# Altium PCB INS_Visualizer.PcbDoc
Units mm, origin at the board's own origin, x right, y up, seen from the top; angles counter-clockwise.
Board outline 100 x 70 mm, 2 copper layers (Top Layer, Bottom Layer), stack 1.671 mm thick; 23 components, 18 nets, 122 pads, 332 vias.
Unrouted connection lines stored in the file: 3.
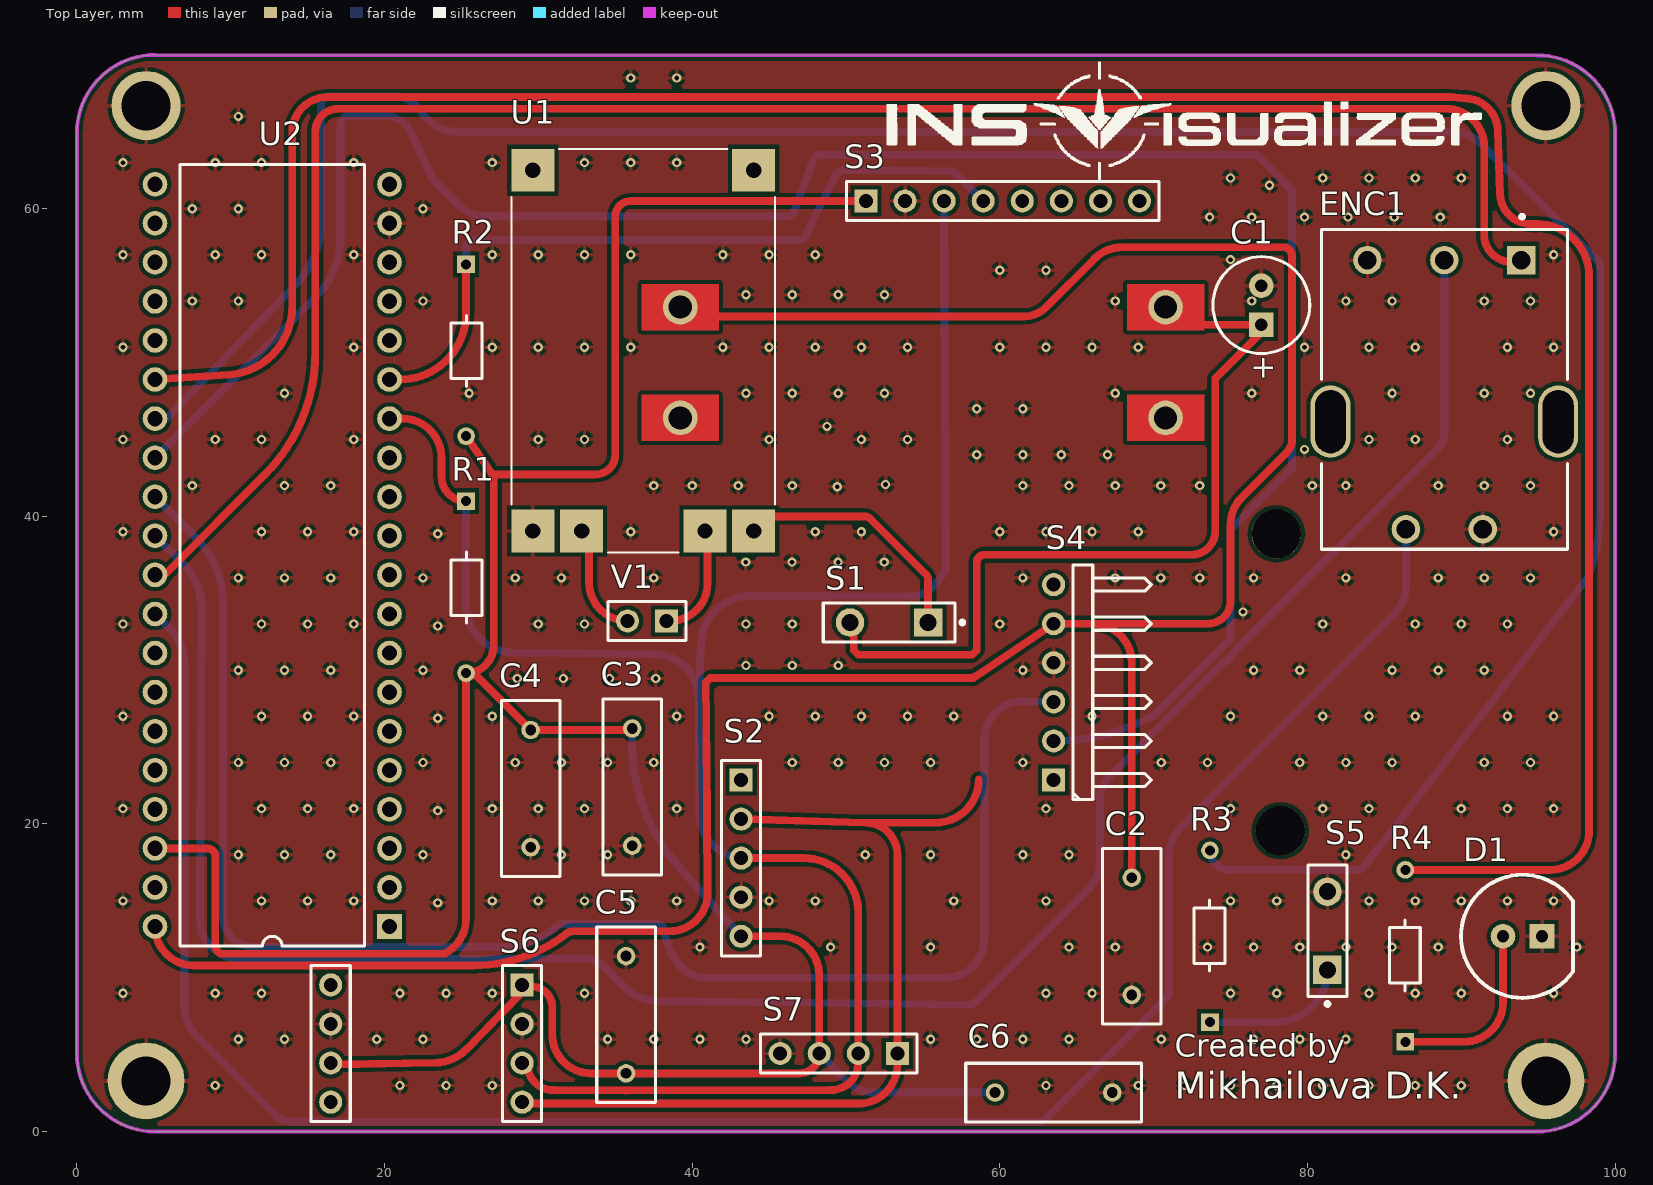
[diagram p0: Top Layer view]
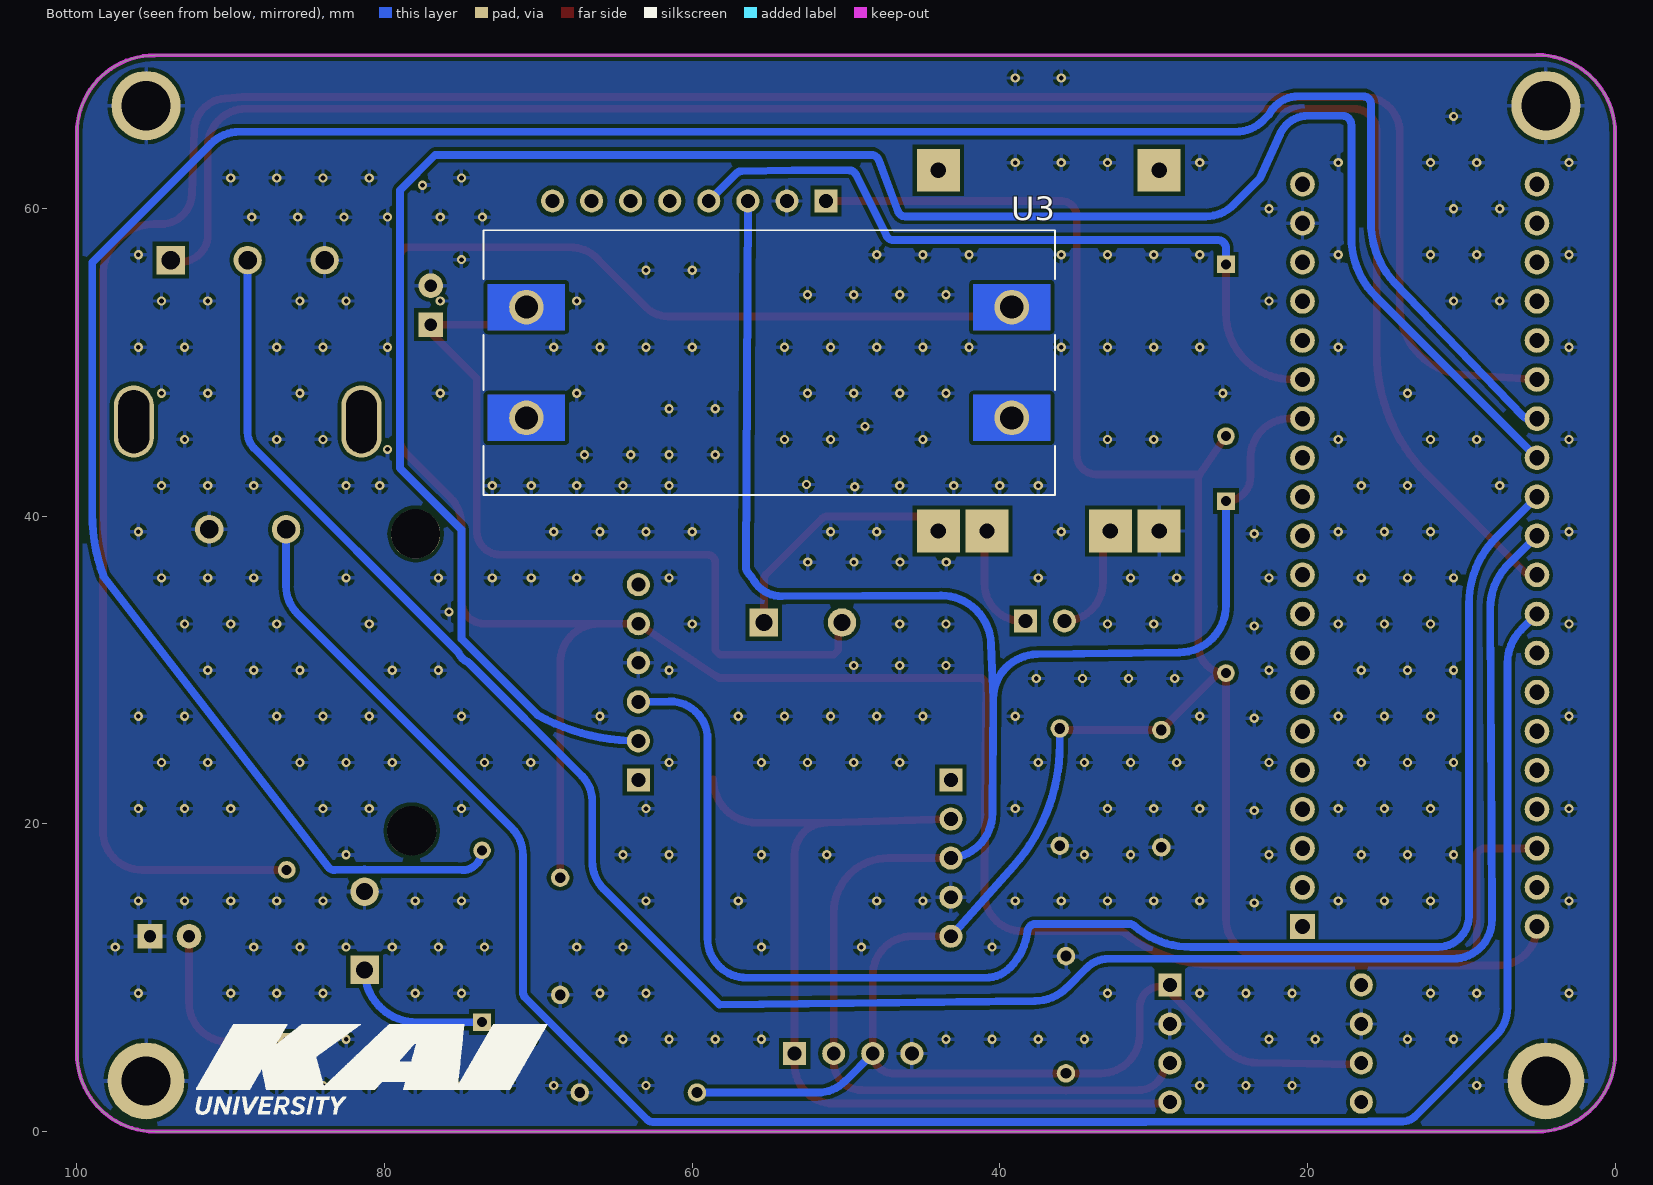
[diagram p1: Bottom Layer view, seen from below]

## Layer stack, top to bottom
Top Solder: solder mask 0.0102, Solder Resist, Dk 3.5
Top Layer: signal copper 0.0356
Dielectric 1: dielectric 1.6, FR-4, Dk 4.8
Bottom Layer: signal copper 0.0356
Bottom Solder: solder mask 0.0102, Solder Resist, Dk 3.5

## Board outline
0,5.08 0,64.92 cw(c5.08,64.92) 5.08,70 94.952,69.973 cw(c94.952,64.924) 100,64.924 100,5.08 cw(c94.92,5.08) 94.92,0 5.08,0 cw(c5.08,5.08)

## Design rules (kind name [scope] priority, off if disabled: settings)
Clearance [All] p1: gap=0.254 ignorepadtopadclearanceinfootprint=FALSE
ComponentClearance [All] p1: gap=0.254 collisioncheckmode=3 verticalgap=0 showdistances=FALSE
PolygonConnect [All] p1: connectstyle=Relief reliefconductorwidth=0.254 reliefentries=4 polygonreliefangle="90 Angle" airgapwidth=0.254
RoutingVias [All] p1: holewidth=0.3 width=0.6 viastyle="Through Hole" minholewidth=0.3 minwidth=0.6 maxholewidth=0.5 maxwidth=1
SolderMaskExpansion [All] p1: expansion=0 istentingtop=FALSE
SupplyNets "Schematic Supply Nets_3" [InNet('+3V3')] p1: voltage=0.000
SupplyNets "Schematic Supply Nets_1" [InNet('GND')] p2: voltage=0.000
SupplyNets "Schematic Supply Nets" [InNet('VCC')] p3: voltage=0.000
Width [All] p1: maxlimit=1.27 minlimit=0.254 preferedwidth=0.508
29 further rules are at their usual default settings.

## Components (designator, comment, footprint, x,y, rotation, side; value= is the part's Value field where it differs from the comment)
C1 "Capacitor Pol" "Capacitor Pol" 77,53.73 r90 top value=47uF
C2 "Capacitor Cer" "CAPACITOR CER" 68.58,12.7 r90 top value=100nF
C3 "Capacitor Cer" "CAPACITOR CER" 36.1,22.4 r90 top value=100nF
C4 "Capacitor Cer" "CAPACITOR CER" 29.5,22.3 r90 top value=100nF
C5 "Capacitor Cer" "CAPACITOR CER" 35.7,7.6 r270 top value=100nF
C6 "Capacitor Cer" "CAPACITOR CER" 63.5,2.54 r180 top value=100nF
D1 "LED 8mm" LED 93.98,12.7 r0 top
ENC1 "PEC16-4115F-S0012" FP-PEC16-4115F-S0012-MFG 88.9,48.26 r180 top
R1 "Resistor" Resistor 25.3,35.4 r270 top value=2K2
R2 "Resistor" Resistor 25.3,50.8 r270 top value=2K2
R3 "Resistor" Resistor 73.66,12.7 r90 top value=330
R4 "Resistor" Resistor 86.36,11.43 r90 top value=330
S1 "SW-SPST" SPST-2 52.8,33.1 r180 top
S2 "QMC5883L" QMC5883L 43.18,22.86 r270 top
S3 "MPU_6050" MPU6050_HDR1X8 51.3,60.5 r0 top
S4 "HC-05" HC-05_HDR1x6H 63.5,22.86 r90 top
S5 "SW-PB" SPST-2 81.3,13.06 r90 top
S6 "BMP580" BMP580_HDR1x4 28.946,9.54 r270 top
S7 "OLED_I2C_128*64" OLED_HDR1x4 53.34,5.08 r180 top
U1 "TP4056_Type_c" TP4056_TYPE_C 36.82,50.775 r270 top
U2 "STM32_BlackPillf411" STM32_HDR2x20 20.32,13.335 r180 top
U3 "MT3608" MT3608 55,50 r180 bottom
V1 "Constant Voltage Source" BATTERY 38.34,33.2 r180 top

## Footprints (in the part's own frame and the unit in brackets; to place one, negate y for a bottom-side part, rotate by r counter-clockwise, add the part's x,y. Pads: shape width x height; smd on the part's side, far side on the other; paste and mask are expansions set on the pad)
BATTERY [mm] "Connector; Header; 2 Position"
  rect 1.5x1.5 hole 0.9: 1(0,0)
  round 1.5 hole 0.9: 2(2.54,0)
  silkscreen extent -1.27,-1.27 3.81,1.27
BMP580_HDR1x4 [mm]
  rect 1.5x1.5 hole 0.9: 1(0,0)
  round 1.5 hole 0.9: 2(2.54,0) 3(5.08,0) 4(7.62,0) 5(7.62,-12.446) 6(5.08,-12.446) 7(2.54,-12.446) 8(0,-12.446)
  silkscreen extent -1.27,-13.72 8.89,1.27, body extent -1.27,-13.72 8.89,1.27, height 8.89
"CAPACITOR CER" [mm]
  round 1.2 hole 0.7: 1(-3.81,0) 2(3.81,0)
  silkscreen extent -5.71,-1.91 5.71,1.91, body extent -4.43,-2.28 4.43,2.29, height 3.2
"Capacitor Pol" [mm]
  rect 1.6x1.6 hole 0.8: 1(-1.27,0)
  round 1.6 hole 0.8: 2(1.27,0)
  silkscreen extent -3.15,-3.15 3.15,3.15, body extent -2.5,-2.49 2.5,2.49, height 11.5
FP-PEC16-4115F-S0012-MFG [mm]
  rrect100% 2.6x4.7 hole 4.1 slot 2 at 0 deg paste-2539.97 mask+0: 1(-7.4,2.1) 2(7.4,2.1)
  rect 1.85x1.85 hole 1.2 paste-2539.97 mask+0: A(-5,-8.4)
  round 1.85 hole 1.2 paste-2539.97 mask+0: B(0,-8.4) C(5,-8.4) D(-2.5,9.1) E(2.5,9.1)
  silkscreen extent -8,-11.35 8,10.4, body extent -8.8,-10.5 8.8,10.5, height 0.25
HC-05_HDR1x6H [mm]
  rect 1.5x1.5 hole 0.9: 1(0,0)
  round 1.5 hole 0.9: 2(2.54,0) 3(5.08,0) 4(7.62,0) 5(10.16,0) 6(12.7,0)
  silkscreen extent -1.27,-6.35 13.97,-1.27, body extent -1.53,-40.58 14.23,0.38, height 4.47
LED [mm] "8mm"
  round 1.6 hole 0.8: 1(-1.27,0)
  rect 1.6x1.6 hole 0.8: 2(1.27,0)
  silkscreen extent -4,-4 3.28,4, body extent -4.5,-4.5 3.9,4.5, height 12
MPU6050_HDR1X8 [mm] "Connector; Header; 8 Position"
  rect 1.5x1.5 hole 0.9: 1(0,0)
  round 1.5 hole 0.9: 2(2.54,0) 3(5.08,0) 4(7.62,0) 5(10.16,0) 6(12.7,0) 7(15.24,0) 8(17.78,0)
  silkscreen extent -1.27,-1.27 19.05,1.27, body extent -1.66,-14.6 19.44,1.27, height 6.07
MT3608 [mm] "DC-DC"
  round 2.25 hole 1.5 mask+0: 1(-15.775,3.6) 2(-15.775,-3.6) 3(15.775,3.6) 4(15.775,-3.6)
  Top Layer region: 18.275,-5.1 13.275,-5.1 13.275,-2.1 18.275,-2.1
  Top Layer region: -13.275,-5.1 -18.275,-5.1 -18.275,-2.1 -13.275,-2.1
  Top Layer region: 18.275,2.1 13.275,2.1 13.275,5.1 18.275,5.1
  Top Layer region: -13.275,2.1 -18.275,2.1 -18.275,5.1 -13.275,5.1
  Bottom Layer region: 18.275,-5.1 13.275,-5.1 13.275,-2.1 18.275,-2.1
  Bottom Layer region: -13.275,-5.1 -18.275,-5.1 -18.275,-2.1 -13.275,-2.1
  Bottom Layer region: 18.275,2.1 13.275,2.1 13.275,5.1 18.275,5.1
  Bottom Layer region: -13.275,2.1 -18.275,2.1 -18.275,5.1 -13.275,5.1
  silkscreen extent -18.57,-8.6 18.57,8.6, body extent -18.57,-8.83 18.58,8.6, height 6.45
OLED_HDR1x4 [mm]
  rect 1.5x1.5 hole 0.9: 1(0,0)
  round 1.5 hole 0.9: 2(2.54,0) 3(5.08,0) 4(7.62,0)
  silkscreen extent -1.27,-1.27 8.89,1.27, body extent -1.27,-1.27 8.89,1.27, height 8.89
QMC5883L [mm]
  rect 1.5x1.5 hole 0.9: 1(0,0)
  round 1.5 hole 0.9: 2(2.54,0) 3(5.08,0) 4(7.62,0) 5(10.16,0)
  silkscreen extent -1.27,-1.27 11.43,1.27, body extent -1.65,-1.38 11.85,17.12, height 8.89
Resistor [mm] "2.2kOhm"
  rect 1.15x1.15 hole 0.65 paste-2539.97 mask+0: 1(-5.588,0)
  round 1.15 hole 0.65 paste-2539.97 mask+0: 2(5.588,0)
  silkscreen extent -2.27,-0.97 2.34,1.03, body extent -5.77,-1.2 5.77,1.2, height 2.39
SPST-2 [mm] "Switch; 2 Leads"
  rect 1.85x1.85 hole 1.1: 1(-2.54,0)
  round 1.85 hole 1.1: 2(2.54,0)
  silkscreen extent -4.89,-1.27 4.28,1.27
STM32_HDR2x20 [mm]
  rect 1.6x1.6 hole 1: 1(0,0)
  round 1.6 hole 1: 2(0,-2.54) 3(0,-5.08) 4(0,-7.62) 5(0,-10.16) 6(0,-12.7) 7(0,-15.24) 8(0,-17.78) 9(0,-20.32) 10(0,-22.86) 11(0,-25.4) 12(0,-27.94) 13(0,-30.48) 14(0,-33.02) 15(0,-35.56) 16(0,-38.1) 17(0,-40.64) 18(0,-43.18) 19(0,-45.72) 20(0,-48.26) 21(15.24,-48.26) 22(15.24,-45.72) 23(15.24,-43.18) 24(15.24,-40.64) 25(15.24,-38.1) 26(15.24,-35.56) 27(15.24,-33.02) 28(15.24,-30.48) 29(15.24,-27.94) 30(15.24,-25.4) 31(15.24,-22.86) 32(15.24,-20.32) 33(15.24,-17.78) 34(15.24,-15.24) 35(15.24,-12.7) 36(15.24,-10.16) 37(15.24,-7.62) 38(15.24,-5.08) 39(15.24,-2.54) 40(15.24,0)
  silkscreen extent 1.63,-49.53 13.61,1.27, body extent -2.54,-54.1 17.78,2.54, height 12.86
TP4056_TYPE_C [mm]
  rect 2.79x2.79 / inner round 2.79 / far side rect 2.79x2.79 hole 1 mask+0.102: BAT_N(11.725,-4.01) BAT_P(11.725,4.01) IN_N(-11.725,-7.18) IN_P(-11.725,7.18) OUT_N(11.725,-7.18) OUT_P(11.725,7.18)
  silkscreen extent -13.12,-8.57 13.12,8.57, body extent -14.39,-8.7 14.91,8.7, height 4.14

## Part data
C1: "Polarized Capacitor (Radial)", LatestRevisionDate=17-Jul-2002, LatestRevisionNote="Re-released for DXP Platform.", PackageDescription="Polarized Capacitor (Radial); 2 Leads", PackageReference=RB7.6-15, Published=8-Jun-2000, Publisher="Altium Limited"
ENC1: library part CMP-07421-000056-1, "ROTARY ENCODER MECHANICAL 12PPR", Max Operating Temperature=70°C, Min Operating Temperature=-30°C, Operating Supply Voltage=5V, Package Quantity=50, Built in Switch=Yes, Detent=Yes, Encoder Type=Mechanical, Height=17.3mm, Length=23mm, Mount="Through Hole", Number of Channels=2, Orientation=Vertical, Output Type=Quadrature, Pulses per Revolution=12, RoHS Compliant=Yes, Series=PEC16, Termination="PC Pin", Width=16mm
S1: "Single-Pole, Single-Throw Switch", LatestRevisionDate=17-Jul-2002, LatestRevisionNote="Re-released for DXP Platform.", PackageDescription="Switch; 2 Leads", PackageReference=SPST-2, Published=24-Mar-1999, Publisher="Altium Limited"
S5: "Switch", LatestRevisionDate=17-Jul-2002, LatestRevisionNote="Re-released for DXP Platform.", PackageDescription="Switch; 2 Leads", PackageReference=SPST-2, Published=24-Mar-1999, Publisher="Altium Limited"
U1: "The TP4056ES Li-Ion charger is an improved version of the TP4056, ideal for 18650 batteries, with a micro USB connection for direct PC charging.", Package=Package, Check_prices=https://www.snapeda.com/parts/TP4056%20Micro-USB%20Charger%20-%201A/Generic/view-part/?ref=eda, MF=Generic, MP="TP4056 Micro-USB Charger - 1A", SnapEDA_Link=https://www.snapeda.com/parts/TP4056%20Micro-USB%20Charger%20-%201A/Generic/view-part/?ref=snap
V1: library part Battery, DC Magnitude="3.0 - 4.0V", SimulationGenericComponent=True
C2 C3 C4 C5 C6: LatestRevisionDate=17-Jul-2002, LatestRevisionNote="Re-released for DXP Platform.", PackageDescription="Radial Cap, Thru-Hole; 2 Leads; 0.3 in Pin Spacing", PackageReference=RAD-0.3, Published=8-Jun-2000, Publisher="Altium Limited"
R1 R2 R3 R4: LatestRevisionDate=17-Jul-2002, LatestRevisionNote="Re-released for DXP Platform.", PackageDescription="Axial Device, Thru-Hole; 2 Leads; 0.3 in Pin Spacing", PackageReference=AXIAL-0.3, Published=8-Jun-2000, Publisher="Altium Limited"

## Free pads (board coordinates)
  round 5 hole 3.2 paste-2539.97 mask-2539.97: 1(4.5,3.3) 1(95.5,3.3)
  round 4.5 hole 3.2 paste-2539.97 mask-2539.97: 1(4.5,66.7) 1(95.5,66.7)
  round 3.2 hole 3.2 unplated: 2(77.978,38.862) 2(78.232,19.558)

## Via types
v1: diameter 0.6, hole 0.3, Top Layer to Bottom Layer, 332 vias

## Nets (pads, with @x,y where several pads share a name; then routed paths per layer and width w, separated by ;. In a path a pad name is that pad's centre, name@x,y a point inside that pad or via, vN(x,y) a via of type N, cw(c..) or ccw(c..) an arc to the next point about the centre after c; other vN are vias at no path point)
+3V3: C3.2 C4.2 C5.2 C6.2 R1.2 R2.2 S2.5 S3.1 S6.1 S6.6 S7.3 U2.38 | length 192.7
  Top Layer w0.508: U2.38 8.492,18.415 cw(c8.492,17.907) 9,17.907 9,12.07 ccw(c9.508,12.07) 9.508,11.562 23.76,11.562 ccw(c23.758,12.07) 24.006,11.627 ccw(c22.76,13.84) 25.3,13.84 R1.2 ; S6.6@16.854,4.36 23.299,4.478 ccw(c23.245,7.389) 25.337,5.364 28.804,8.944 29.3,9.44 29.796,9.419 cw(c29.56,8.1) 30.9,8.1 30.9,6.33 ccw(c33.44,6.33) 33.44,3.79 C5.2 46.97,3.79 ccw(c46.97,5.08) S7.3 48.26,10.16 ccw(c45.72,10.16) 45.72,12.7 S2.5 ; R2.2 27.01,42.73 ; C3.2 cw(c35.859,26.451) 35.859,26.11 C4.2 26.15,29.46 ccw(c25.3,28.61) R1.2 ; S3.1@51.697,60.5 36,60.5 ccw(c36,59.5) 35,59.5 35,44.003 cw(c33.727,44.003) 33.727,42.73 27.01,42.73 ; R1.2 ccw(c25.3,31.612) 27.1,31.612 27.1,42.442 ccw(c26.592,42.442) 27.01,42.73
  Bottom Layer w0.508: C3.2 36.1,25.173 ccw(c47.997,25.173) 39.118,17.254 S2.5 ; S7.3 50.056,3.284 ccw(c51.852,5.08) 51.852,2.54 C6.2
GND: C1.2 C2.1 C3.1 C4.1 C5.1 C6.1 D1.2 ENC1.C ENC1.D pad.1 S2.4 S3.2 S4.4 S5.2 S6.2 S6.7 S7.4 U1.OUT_N U2.19 U3.2 U3.4
  other v1: 9,3 21,3 24,3 27,3 63,3 69,3 72,3 75,3 78,3 81,3 84,3 87,3 90,3 10.5,6 13.5,6 19.5,6 22.5,6 34.5,6 37.5,6 40.5,6 43.5,6 55.5,6 58.5,6 61.5,6 64.5,6 70.5,6 76.5,6 79.5,6 82.5,6 3,9 9,9 12,9 21,9 24,9 27,9 33,9 63,9 66,9 75,9 78,9 84,9 87,9 90,9 96,9 40.5,12 49,12 55.5,12 64.5,12 67.5,12 73.5,12 76.5,12 79.5,12 82.5,12 85.5,12 88.5,12 97.5,12 23.46,14.873 3,15 12,15 15,15 18,15 27,15 30,15 33,15 36,15 39,15 45,15 48,15 57,15 63,15 75,15 78,15 84,15 87,15 90,15 93,15 96,15 10.5,18 13.5,18 16.5,18 22.5,18 31.5,18 34.5,18 51.252,17.999 55.5,18 61.5,18 64.5,18 82.5,18 23.46,20.873 3,21 12,21 15,21 18,21 27,21 30,21 33,21 39,21 63,21 75,21 81,21 84,21 90,21 93,21 96,21 10.5,24 13.5,24 16.5,24 22.5,24 28.5,24 31.5,24 34.5,24 37.5,24 46.5,24 49.5,24 52.5,24 55.5,24 61.5,24 70.5,24 73.5,24 79.5,24 82.5,24 85.5,24 91.5,24 94.5,24 23.46,26.873 3,27 12,27 15,27 18,27 27,27 39,27 45,27 48,27 51,27 54,27 57,27 66,27 75,27 81,27 84,27 87,27 93,27 96,27 28.627,29.46 31.627,29.46 34.627,29.46 37.627,29.46 10.5,30 13.5,30 16.5,30 22.5,30 61.5,30 76.5,30 79.5,30 85.5,30 88.5,30 91.5,30 43.5,30.304 46.5,30.304 49.5,30.305 23.46,32.873 3,33 12,33 15,33 18,33 30,33 33,33 43.5,33 46.5,33 60,33 81,33 87,33 90,33 93,33 75.808,33.787 10.5,36 13.5,36 16.5,36 22.5,36 28.5,36 31.5,36 37.5,36 61.5,36 67.5,36 70.467,36 73,36 76.5,36 82.5,36 88.5,36 91.5,36 94.5,36 43.488,37.027 46.488,37.027 49.488,37.027 52.488,37.027 23.46,38.873 3,39 12,39 15,39 18,39 36,39 48,39 51,39 60,39 63,39 66,39 69,39 96,39 49.429,41.929 7.5,42 13.5,42 16.5,42 37.5,42 40,42 43,42 46.5,42 61.5,42 64.5,42 67.5,42 70.467,42 73,42 80.308,42 82.5,42 88.5,42 91.5,42 94.5,42 52.571,42.071 58.5,44 61.5,44 64,44 67,44 79.808,44.352 3,45 9,45 12,45 18,45 30,45 33,45 45,45 51,45 54,45 84,45 87,45 93,45 48.766,45.848 58.5,47 61.5,47 13.5,48 25.5,48 43.5,48 46.5,48 49.5,48 52.5,48 67.5,48 76.384,48 85.5,48 91.5,48 94.5,48 3,51 18,51 27,51 30,51 33,51 36,51 42,51 45,51 48,51 51,51 54,51 60,51 63,51 66,51 69,51 79.808,51 84,51 87,51 93,51 96,51 7.5,54 10.5,54 22.5,54 67.5,54 76.384,54 82.5,54 85.5,54 91.5,54 94.5,54 43.5,54.408 46.5,54.408 49.5,54.408 52.5,54.408 60,56 63,56 75,56.692 3,57 9,57 12,57 18,57 27,57 30,57 33,57 36,57 42,57 45,57 48,57 96,57 73.639,59.455 76.384,59.455 79.808,59.455 82.639,59.455 85.639,59.455 88.639,59.455 7.5,60 10.5,60 22.5,60 77.529,61.529 75,62 81,62 84,62 87,62 90,62 3,63 9,63 12,63 18,63 27,63 33,63 36,63 39,63 10.5,66 36,68.5 39,68.5
NetC1_1: C1.1 S1.2 U3.1 | length 54.6
  Top Layer w0.508: S1.2 50.5,32.86 50.5,31.298 50.798,31 58.202,31 58.5,31.298 58.5,37 cw(c59,37) 59,37.5 72.46,37.5 ccw(c72.46,39.04) 74,39.04 74,48.96 77.5,52.46 73.289,52.46 71.912,52.46 70.939,53.434 70.78,53.593 U3.1@70.78,53.604
NetD1_1: D1.1 R4.1 | length 12.1
  Top Layer w0.508: R4.1 90.17,5.842 ccw(c90.17,8.382) 92.71,8.382 D1.1
NetENC1_A: ENC1.A U2.31 | length 120.4
  Top Layer w0.508: U2.31 5.485,36.195 ccw(c5.485,36.703) 5.843,36.343 12.23,42.73 ccw(c4.339,50.623) 15.5,50.621 15.5,64.998 cw(c17.001,64.999) 17.002,66.5 89,66.5 cw(c89,64.002) 91.498,64.002 91.498,58.043 ccw(c93.263,58.332) 93.229,56.543 ENC1.A
NetENC1_B: ENC1.B U2.30 | length 139.5
  Bottom Layer w0.508: U2.30 6.93,36.885 cw(c4.071,34.022) 8.117,33.998 8.006,14 8.006,13.778 ccw(c10.546,13.778) 10.546,11.238 32.925,11.238 cw(c32.925,9.218) 34.354,10.646 34.355,10.645 35.636,9.364 35.637,9.363 ccw(c37.761,11.496) 37.722,8.486 58.229,8.251 65.756,15.778 ccw(c63.96,17.574) 66.5,17.574 66.5,21.5 cw(c68.806,21.5) 67.175,23.13 cw(c68.806,21.5) 67.176,23.131 74.513,30.468 cw(c74.872,30.109) 74.653,30.567 ccw(c74.192,31.533) 75.158,31.072 cw(c75.616,30.853) 75.257,31.212 88.478,44.433 ccw(c87.459,45.452) 88.479,44.435 ccw(c87.459,45.452) 88.9,45.452 ENC1.B
NetENC1_E: ENC1.E U2.32 | length 133.6
  Bottom Layer w0.508: U2.32 6.095,32.64 cw(c3.909,30.455) 7,30.456 7,30.453 7,8.052 ccw(c9.54,8.052) 7.744,6.256 13,1 ccw(c13.814,1.814) 13.814,0.663 16.018,0.663 30.515,0.635 62.568,0.635 ccw(c62.568,1.143) 62.873,0.737 ccw(c62.568,1.143) 62.927,0.783 70.852,8.708 ccw(c70.492,9.067) 70.898,8.762 ccw(c70.492,9.067) 71,9.067 71,17.96 cw(c73.54,17.96) 71.744,19.756 85.656,33.669 ccw(c83.86,35.465) 86.4,35.465 ENC1.E
NetR1_1: R1.1 S2.3 S3.3 S6.3 S7.2 U2.14 | length 134.4
  Top Layer w0.508: U2.14 21.16,46.355 cw(c21.16,43.815) 23.7,43.815 23.7,42.59 23.7,42.588 ccw(c25.3,42.588) 24.979,41.021 R1.1 ; S6.3@29.3,4.36 ccw(c30.96,4.36) 30.96,2.7 cw(c30.96,2.192) 30.962,2.7 35.696,2.682 ccw(c35.7,3.79) 35.701,2.682 49,2.7 ccw(c49,4.5) 50.8,4.5 S7.2 50.8,14.24 ccw(c47.26,14.24) 47.26,17.78 S2.3
  Bottom Layer w0.508: R1.1 25.3,34.223 ccw(c28.369,34.222) 28.321,31.153 ; 28.322,31.153 37.575,31.03 cw(c37.538,28.143) 40.425,28.165 ; S2.3 cw(c43.429,20.719) 40.48,20.697 40.48,20.699 40.425,28.165 ; S3.3 56.499,36.682 ; 56.499,36.681 cw(c55.991,36.68) 56.385,36.359 56.093,36.002 cw(c54.17,36.951) 54.166,34.806 43.815,34.855 ccw(c43.84,31.577) 40.565,31.706 40.425,28.165
NetR2_1: R2.1 S2.2 S3.4 S6.4 S7.1 U2.15 | length 108.6
  Top Layer w0.508: U2.15 21.001,48.895 ccw(c21.001,53.194) 25.3,53.194 R2.1 ; S6.4@29.3,1.82 50.8,1.82 ccw(c50.8,4.36) 53.34,4.36 S7.1 53.34,17.999 ccw(c51.252,17.999) 51.252,20.087 ; S2.2 51.252,20.087 ; 58.628,22.896 ccw(c59.136,22.892) 58.628,22.894 cw(c55.82,22.895) 58.628,22.892 cw(c55.82,22.895) 55.82,20.087 51.252,20.087 ; S3.4@59.078,60.498 ccw(c58.57,60.503) 59.072,60.58 S3.4@59.079,60.584
  Bottom Layer w0.508: R2.1 25.3,57.452 cw(c25.808,57.452) 25.808,57.96 46.916,57.96 ccw(c46.916,58.468) 47.37,58.24 ; 47.37,58.241 49.36,62.219 49.36,62.22 cw(c49.814,61.992) 49.814,62.5 53.491,62.5 cw(c53.491,61.992) 53.5,62.5 56.778,62.441 cw(c56.769,61.933) 57.128,62.292 S3.4
NetR3_1: R3.1 S5.1 | length 9.6
  Bottom Layer w0.508: R3.1 77.892,7.112 ccw(c77.892,10.52) 81.233,9.849 S5.1
NetR3_2: R3.2 U2.27 | length 167.8
  Bottom Layer w0.508: U2.27 5.632,46.365 ccw(c5.623,46.873) 5.988,46.52 14.374,55.218 ccw(c14.007,55.569) 14.375,55.219 ccw(c14.007,55.569) 14.384,55.228 14.385,55.23 ccw(c10.057,59.118) 15.875,59.126 15.875,66.802 15.875,66.804 cw(c16.383,66.802) 16.383,67.31 20.561,67.31 20.564,67.31 cw(c20.563,65.134) 22.508,66.108 ; 22.51,66.105 22.508,66.108 ; R3.2 ccw(c74.948,18.288) 74.948,17 ccw(c74.948,17.508) 74.951,17 81.293,17.033 cw(c81.3,15.6) 81.324,17.033 83.246,17.004 ; 83.247,17.004 ccw(c83.254,17.512) 83.655,17.201 98.264,36.088 ccw(c87.37,40.159) 99,40.156 ccw(c87.37,40.159) 99,40.159 99,56.5 91.244,64.256 ccw(c89.448,62.46) 89.448,65 24.669,65 cw(c24.669,67.54) 22.873,65.744 22.508,66.108
NetR4_2: R4.2 U2.26 | length 166.1
  Top Layer w0.508: U2.26 9.851,49.201 ccw(c9.553,53.639) 14,53.639 14,64.963 cw(c16.3,64.963) 16.231,67.262 17.001,67.262 89,67.262 cw(c89,64.002) 89.242,67.253 90.374,67.169 cw(c90.215,65.018) 92.37,65.094 92.52,60.945 ; R4.2 89.975,17.01 95.769,17.01 ccw(c95.769,19.55) 98.309,19.55 98.309,55.653 ccw(c94.96,55.651) 98.309,55.654 ccw(c94.96,55.651) 94.96,59 94.538,59 cw(c94.536,61.018) 92.52,60.944
NetS1_1: S1.1 U1.OUT_P | length 15.9
  Top Layer w0.508: U1.OUT_P@43.983,40 51.212,40 cw(c51.212,39.492) 51.57,39.852 55.192,36.23 cw(c54.832,35.872) 55.34,35.872 S1.1
NetS4_2: S4.2 U2.28 | length 140.1
  Bottom Layer w0.508: U2.28 15.56,54.295 ccw(c11.743,58.118) 17.145,58.12 17.145,65.405 cw(c17.907,65.405) 17.247,65.786 cw(c17.907,65.405) 17.249,65.789 cw(c17.687,65.532) 17.382,65.938 cw(c17.687,65.532) 17.685,66.04 19.967,66.04 19.97,66.04 cw(c19.969,64.06) 21.771,64.88 21.772,64.878 23.097,61.962 24.815,60.244 ccw(c26.612,62.04) 26.612,59.5 46.148,59.5 ccw(c46.148,60.008) 46.624,59.83 47.876,63.17 cw(c48.352,62.992) 48.352,63.5 76.7,63.5 79,61.2 79,43.138 75,39.138 75,32.033 70.061,27.094 cw(c63.508,38.924) S4.2
NetS4_3: S4.3 U2.29 | length 102.1
  Bottom Layer w0.508: U2.29 7.715,38.64 cw(c3.415,34.335) 9.5,34.336 9.5,14.005 ccw(c10.008,14.005) 9.5,13.997 9.5,13.995 ccw(c11.533,14.033) 11.502,12 27.575,12 27.577,12 ccw(c27.577,17.594) 31.251,13.376 cw(c31.584,12.992) 31.582,13.5 37.693,13.5 cw(c37.693,12.992) 38.197,13.05 ccw(c42.191,13.5) 39.348,10.659 ccw(c40.939,12.249) 40.937,10 40.939,10 48,10 56.44,10 ccw(c56.44,12.54) 58.236,10.744 58.256,10.764 ccw(c56.46,12.56) 59,12.56 59,25.518 59,25.52 cw(c61.447,25.52) 61.48,27.967 61.482,27.967 S4.3
NetU1_BAT_N: U1.BAT_N V1.2 | length 7.3
  Top Layer w0.508: U1.BAT_N@33.3,39.05 33.3,35.7 ccw(c35.8,35.7) V1.2
NetU1_BAT_P: U1.BAT_P V1.1 | length 7.5
  Top Layer w0.508: V1.1@38.341,33.21 ccw(c38.561,35.64) 41,35.64 41,37.909 U1.BAT_P
VCC: C2.2 S4.5 U2.40 U3.3 | length 172.7
  Top Layer w0.508: U2.40 ccw(c7.615,13.335) 7.615,10.8 25.745,10.8 25.747,10.8 ccw(c25.749,20.782) 31.9,12.921 cw(c32.212,12.52) 32.21,13.028 38.528,13.028 ccw(c38.528,15.5) 41,15.5 40.963,20.631 40.917,26.894 40.878,28.975 40.878,28.984 ; U3.3 ccw(c40.674,55.049) 40.674,53 61.57,53 ccw(c61.57,55.021) 62.998,53.592 66.163,56.756 cw(c67.959,54.96) 67.959,57.5 78.414,57.5 cw(c78.414,56.914) 79,56.914 79,45 cw(c77.793,45) 78.646,44.146 75.744,41.244 ccw(c77.54,39.448) 75,39.448 75,34.5 cw(c73.52,34.5) 73.52,33.02 66.04,33.02 ; 40.878,29.196 41.177,29.495 41.397,29.495 58.11,29.495 58.272,29.5 58.393,29.582 S4.5 66.04,33.02 ; C2.2 68.58,30.48 ccw(c66.04,30.48) 66.04,33.02
pads on no net: ENC1.1 ENC1.2 S2.1 S3.5 S3.6 S3.7 S3.8 S4.1 S4.6 S6.5 S6.8 U1.IN_N U1.IN_P U2.1 U2.2 U2.3 U2.4 U2.5 U2.6 U2.7 U2.8 U2.9 U2.10 U2.11 U2.12 U2.13 U2.16 U2.17 U2.18 U2.20 U2.21 U2.22 U2.23 U2.24 U2.25 U2.33 U2.34 U2.35 U2.36 U2.37 U2.39

## Polygon pours and split planes (outlines as drawn)
GND on Bottom Layer "GND_L02_P009" (solid, pour order 9): 0,5.08 0,64.92 cw(c5.08,64.92) 5.08,70 94.952,69.973 cw(c94.952,64.924) 100,64.924 100,5.08 cw(c94.92,5.08) 94.92,0 5.08,0 cw(c5.08,5.08)
GND on Top Layer "GND_L01_P008" (solid, pour order 8): 0,5.08 0,64.92 cw(c5.08,64.92) 5.08,70 94.952,69.973 cw(c94.952,64.924) 100,64.924 100,5.08 cw(c94.92,5.08) 94.92,0 5.08,0 cw(c5.08,5.08)

## Keep-outs
Keep-Out Layer:
  the board outline again, w0.254

## Silkscreen, mask and mechanical layers (free items; w line width, h text height)
Top Overlay:
  drawing of 27 lines, arcs and shapes, not listed
  text "Created by" at 71.374,4.37 h2.5
  text "Mikhailova D.K." at 71.374,1.552 h3
Bottom Overlay:
  drawing of 11 lines, arcs and shapes, not listed
Top Solder:
  circle w2.5: c95.5,3.3 r1.25
  circle w2.5: c4.5,3.3 r1.25
  circle w2.5: c95.5,66.7 r1.25
  circle w2.5: c4.5,66.7 r1.25
Bottom Solder:
  circle w2.5: c95.5,3.3 r1.25
  circle w2.5: c4.5,3.3 r1.25
  circle w2.5: c95.5,66.7 r1.25
  circle w2.5: c4.5,66.7 r1.25

## Text inside footprints (layer, text, board x,y; h text height)
C1: Top Overlay "+" at 77.762,48.777 h1.5 r90
U3: Bottom 3D Body "VOUT_N" at 73,43 h1.27; Bottom 3D Body "VOUT_P" at 73,55.75 h1.27; Bottom 3D Body "VIN_N" at 42,43 h1.27; Bottom 3D Body "VIN_P" at 42,55.75 h1.27